# Allegro board mib_fp_jtag_serial_12.brd
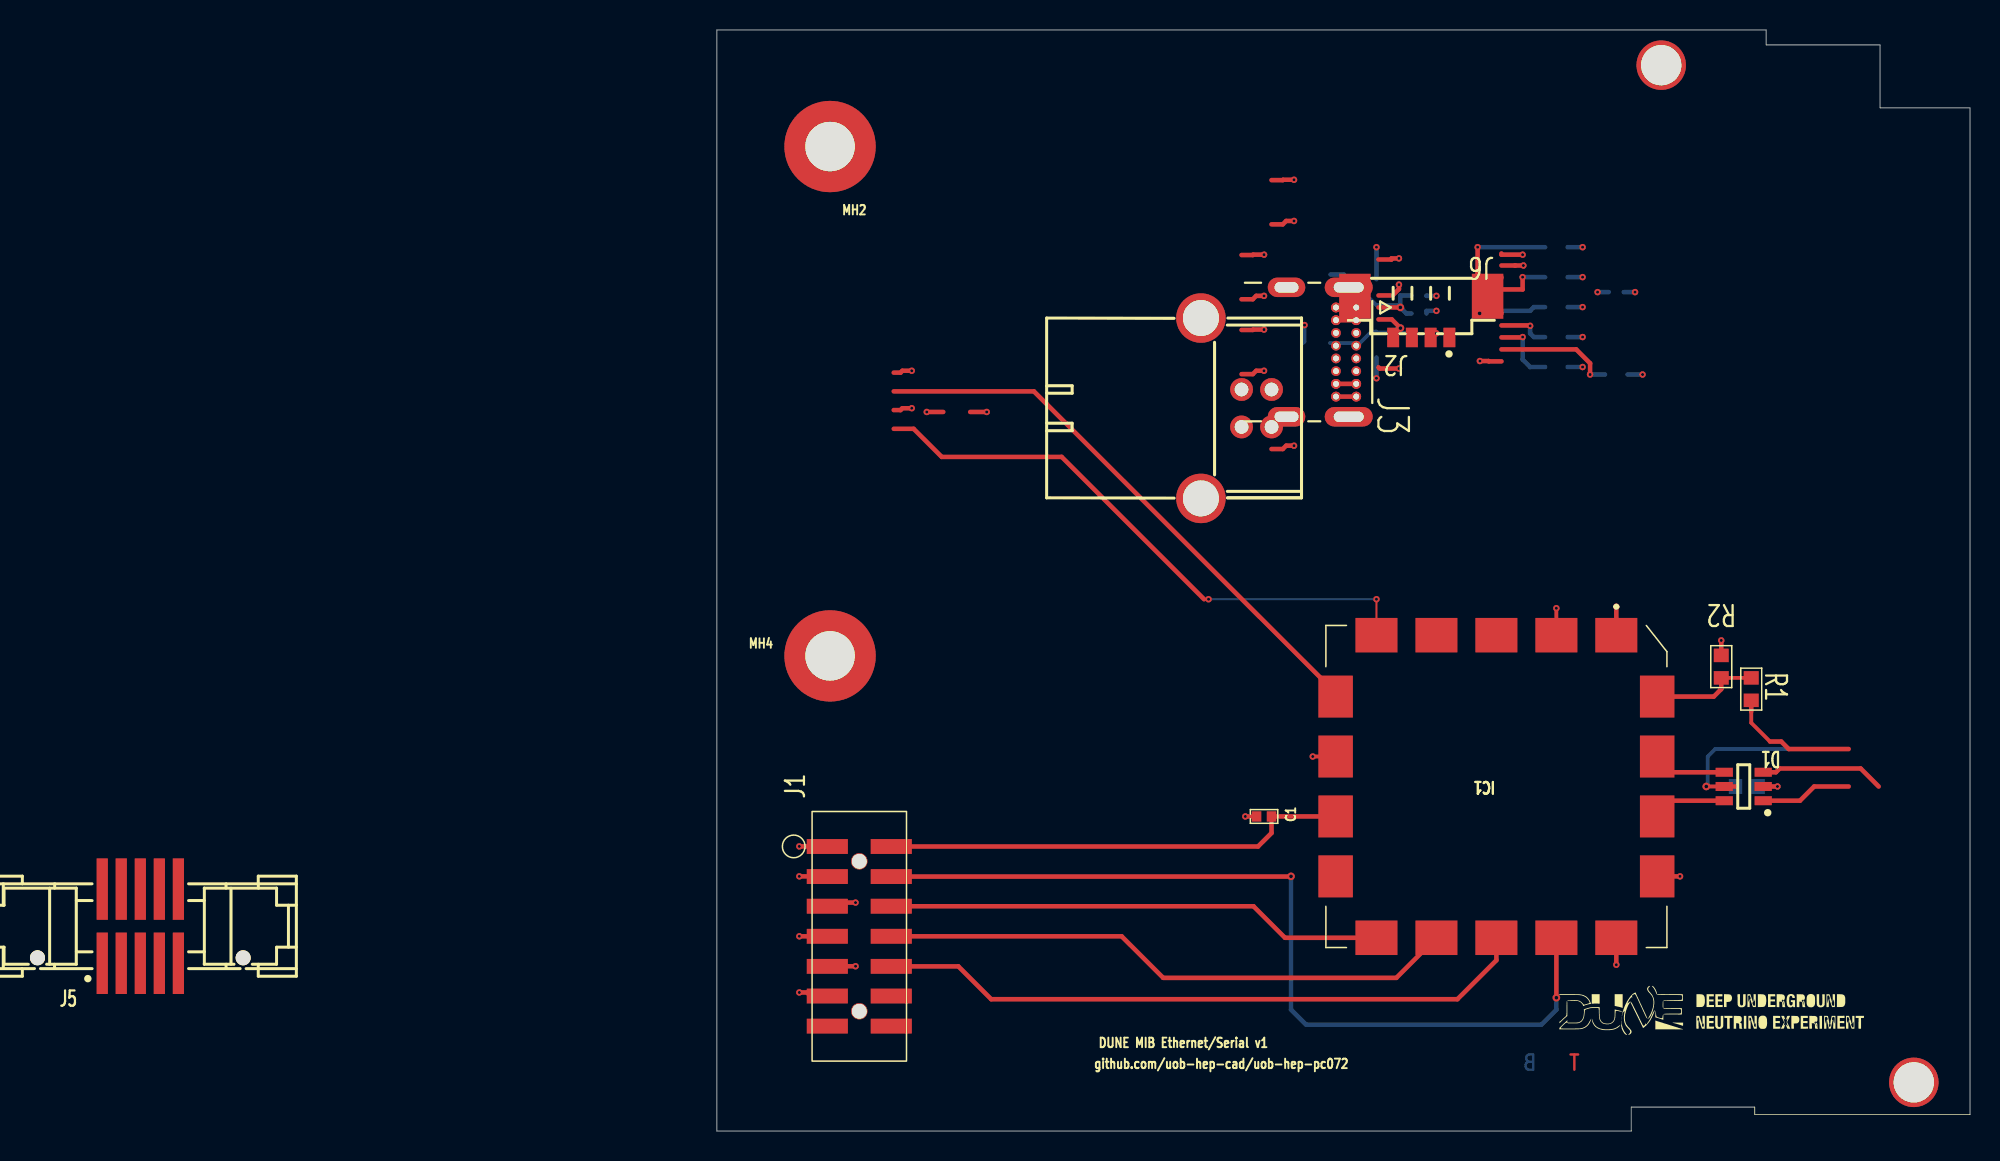
[diagram p0: board, top side]
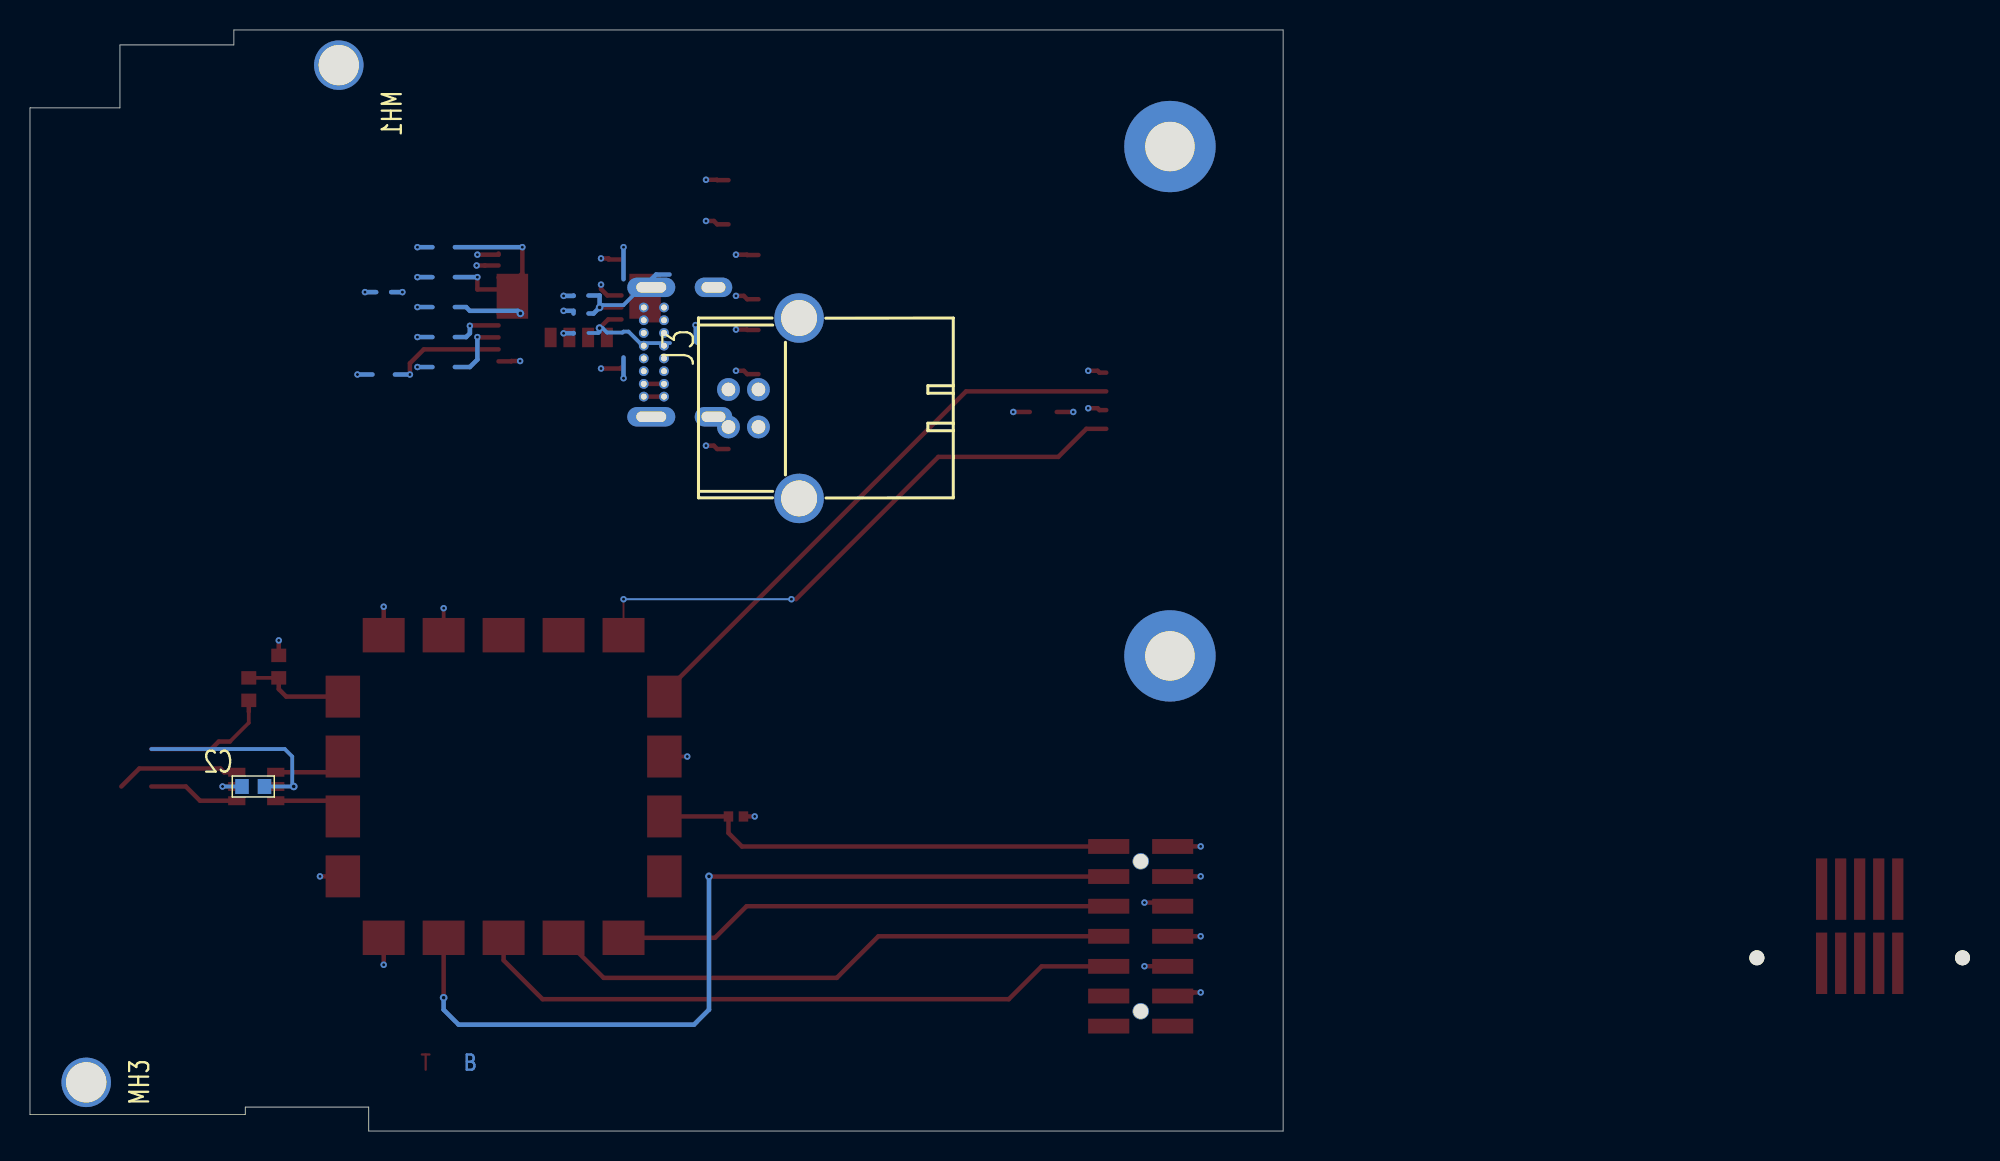
[diagram p1: board, bottom side, seen from below]

Outline 83.59 x 73.5 mm; copper layers: TOP, 02_GND, 03_VCC, BOTTOM. Coordinates in mm from the lower left corner of the outline.
Outline path: 0,73.5 70,73.5 70,72.5 77.59,72.5 77.59,68.3 83.59,68.3 83.59,1.1 69.24,1.1 69.24,1.6 61,1.6 61,0 0,0 0,73.5

## Design rules (mm)
constraint set DEFAULT: min track width 0.127
net group VREF_JTAG: nets GND VREF_JTAG

## Placement (name value [footprint] x y rotation side)
C1  0.1UF  [CAP0402]  36.5 21 180 top
C2  100nF  [C0603]  68.7 23 180 bottom
D1  -  [SOT95P280X145-6N]  68.5 23 180 top
IC1  -  [410357B]  52 23 180 top
J1  7X2RECPT_SMD_2MM  [HDR14PINSMD]  9.5 13 90 top
J2  -  [MOLEX_2137160001]  35 52 270 top
J3  -  [JACK12X17_USB4B]  37 47 270 top
J5  -  [SAMTEC_EHF-105-01-L-D-SM-LC]  -38.46 13.67 0 top
J6  -  [MOLEX_53398-0471]  48.24 54.77 180 top
MH1  MT_HOLE  [MOUNTHOLE]  63 71.15 180 bottom
MH2  MT_HOLE  [MOUNTHOLE]  7.55 65.72 0 top
MH3  MT_HOLE  [MOUNTHOLE]  79.84 3.25 180 bottom
MH4  MT_HOLE  [MOUNTHOLE]  7.55 31.72 0 top
NOREF  -  []  0 0 90 top
NOREF#2  -  []  56.2 6.4 0 top
NOREF#3  -  []  0 73.5 0 top
R1  4.7k  [C0603]  69 29.5 270 top
R2  10k  [C0603]  67 31 270 top

## Library data of the parts
C1 = CAP_NP: Tolerance: TOL?; User Part Number: 445-7348-2-ND; part number: CAP_NP-445-7348-2-ND,CAP_NP; room: JTAG
C2 = CAPCERSMDCL2: part number: CAPCERSMDCL2_0603-100NF,16V; tolerance: 10%
D1 = USBLC6-2: part number: USBLC6-2SC6
IC1 = 410_357_B: part number: 410_357_B-DIGILENT,410-357-B
J1 = 7X2RECPT_SMD_2MM: User Part Number: 878321420; part number: 7X2RECPT_SMD_2MM-878321420,7X2RECPT_SMD_2MM; room: JTAG
J2 = CON16P_USB_C_USB2: part number: CON16P_USB_C_USB2-2137160001
J3 = CON4P: part number: CON4P-67068-8001
J5 = CON10P: part number: CON10P-EHF-105-01-L-D-SM-LC
J6 = CON4P: part number: CON4P-53398-0471
MH1 MH2 = MT_HOLE: part number: MT_HOLE-MT_HOLE,MT_HOLE; room: TE0712
MH3 MH4 = MT_HOLE: part number: MT_HOLE-MT_HOLE,MT_HOLE
R1 = RSMD0603: part number: RSMD0603_1/10W-4.7K,1%; tolerance: 1%
R2 = RSMD0603: part number: RSMD0603_1/10W-10K,1%; tolerance: 1%

## Footprints (pads in the part's own frame, mm; a bottom-side part is the same pattern mirrored in y, then rotated)
410357B
  rect 2.8x2.3 smd: 1(-8,-10.1) 2(-4,-10.1) 3(0,-10.1) 4(4,-10.1) 5(8,-10.1) 10(8,10.1) 11(4,10.1) 12(0,10.1) 13(-4,10.1) 14(-8,10.1)
  rect 2.3x2.8 smd: 6(10.725,-6) 7(10.725,-2) 8(10.725,2) 9(10.725,6) 15(-10.725,6) 16(-10.725,2) 17(-10.725,-2) 18(-10.725,-6)
C0603
  rect 0.9x1 smd: 1(-0.75,0) 2(0.75,0)
CAP0402
  rect 0.635x0.686 smd: 1(-0.499,0) 2(0.499,0)
HDR14PINSMD
  round 1.092 hole 0.991 unplated: (-5.004,0) (5.004,0)
  rect 0.991x2.743 smd: 1(5.994,2.134) 2(5.994,-2.134) 3(3.988,2.134) 4(3.988,-2.134) 5(2.007,2.134) 6(2.007,-2.134) 7(0,2.134) 8(0,-2.134) 9(-2.007,2.134) 10(-2.007,-2.134) 11(-3.988,2.134) 12(-3.988,-2.134) 13(-5.994,2.134) 14(-5.994,-2.134)
JACK12X17_USB4B
  round 1.524 hole 0.914: 1(0,0) 2(-2.5,0) 3(-2.5,-2) 4(0,-2)
  round 3.302 hole 2.4: 5(-7.27,-4.71) 6(4.77,-4.71)
MOLEX_53398-0471
  rect 2.1x3 smd: (-3.175,-0.95) (5.675,-0.95)
  rect 0.8x1.3 smd: 1(-0.625,1.8) 2(0.625,1.8) 3(1.875,1.8) 4(3.125,1.8)
MOLEX_2137160001
  round 0.648 hole 0.4: A1(-2.975,7.65) A4(-2.125,7.65) A5(-1.275,7.65) A6(-0.425,7.65) A7(0.425,7.65) A8(1.275,7.65) A9(2.125,7.65) A12(2.975,7.65) B1(2.975,6.3) B4(2.125,6.3) B5(1.275,6.3) B6(0.425,6.3) B7(-0.425,6.3) B8(-1.275,6.3) B9(-2.125,6.3) B12(-2.975,6.3)
  oval 1.3x2.5 hole 0.7x1.6: SH1(-4.32,3) SH2(4.32,3)
  oval 1.3x3.2 hole 0.7x2: SH3(-4.32,7.15) SH4(4.32,7.15)
MOUNTHOLE
  round 6.096 hole 3.302: 1(0,0)
SAMTEC_EHF-105-01-L-D-SM-LC
  round 1 hole 1.2 unplated: (-6.86,-2.11) (6.86,-2.11)
  rect 0.75x4.1 smd: 1(-2.54,-2.475) 2(-2.54,2.475) 3(-1.27,-2.475) 4(-1.27,2.475) 5(0,-2.475) 6(0,2.475) 7(1.27,-2.475) 8(1.27,2.475) 9(2.54,-2.475) 10(2.54,2.475)
SOT95P280X145-6N
  rect 1.15x0.6 smd: 1(-1.3,0.95) 2(-1.3,0) 3(-1.3,-0.95) 4(1.3,-0.95) 5(1.3,0) 6(1.3,0.95)

## Nets
GND: C1.2 C2.1 D1.2 IC1.1 IC1.7 IC1.14 J1.1 J1.3 J1.5 J1.7 J1.9 J1.11 J3.4(A<3>) J3.5 J3.6 J5.2 J5.10(A<9>) J6.1 MH1.1(MH_SIG) MH2.1(MH_SIG) MH3.1(MH_SIG) MH4.1(MH_SIG) R2.1
P5V: C2.2(B<0>) D1.5(VBUS) J3.1 R1.2(B<0>)
VCC3V3: IC1.2 IC1.15 J6.3
MP3V3: J5.4
RESET*: J5.6
TCK: IC1.10 J1.6 J5.1
TDI: IC1.12 J1.10 J5.9
TDO: IC1.11 J1.8 J5.3
TMS: IC1.13 J1.4 J5.5
TRST*: J5.8
UART_RX_TO_FPGA_3V3: IC1.6 J6.2
UART_TX_FROM_FPGA_3V3: IC1.5 J6.4(A<3>)
UNNAMED_1_410357B_I128_USBDM: D1.6 IC1.16
UNNAMED_1_410357B_I128_USBDP: D1.4 IC1.17
UNNAMED_1_410357B_I128_VBUSDETE: IC1.18 R1.1 R2.2(B<0>)
UNNAMED_1_CON4P_I129_A: D1.1 J3.2
UNNAMED_1_CON4P_I129_A_1: D1.3 J3.3
VREF_JTAG: C1.1 IC1.8(VREF_JTAG) J1.2

Pads without a net: IC1 3 4 9; J1 12 13 14; J2 A1 A4 A5 A6 A7 A8 A9 A12 B1 B4 B5 B6 B7 B8 B9 B12 SH1 SH2 SH3 SH4; J5 7

## Via types
v1: diameter 0.508, hole 0.254, TOP to BOTTOM, 6 vias
v2: diameter 0.432, hole 0.203, TOP to BOTTOM, 52 vias

## Routing (per net, layer and track width the routed paths; a pad name or vN(x,y) marks a point on that pad's centre or on a via; arc(x,y) is an arc through that point)
GND: length 50.5
  TOP w0.254: v2(39.75,25) IC1.7
  TOP w0.3: 52.34,57.78 53.25,57.78 53.25,57.78 v2(53.8,57.78) ; v2(13,50.75) 12.38,50.75 12.25,50.62 11.8,50.62 ; v2(60,11.1) IC1.14 ; 52.34,58.58 52.34,58.5 v2(53.75,58.5) ; v2(35.25,21) C1.2 ; v2(45.5,50.9) 44.22,50.9 44.14,50.98 ; v2(5.5,13) J1.7 ; v2(38.5,63.5) 37.78,63.5 37.75,63.48 37,63.48 ; v2(50.9,51.4) 51.48,51.4 51.5,51.38 52.34,51.38 ; v2(36.5,53.5) 35.78,53.5 35.75,53.48 35,53.48 ; v2(45.5,58.25) 45,58.25 45,58.18 44.14,58.18 ; J1.5 8.25,15.01 8.49,15.25 v2(9.25,15.25) ; v2(38.5,45.75) 37.97,45.75 37.75,45.52 37,45.52 ; v2(70.75,23) D1.2 ; v2(18,48) 16.9,48 ; v2(5.5,19) 6.24,19 6.25,18.99 J1.1 ; v2(36.5,55.75) 35.97,55.75 35.75,55.52 35,55.52 ; 35,58.48 35.75,58.48 35.78,58.5 v2(36.5,58.5) ; J1.9 8.25,10.99 8.26,11 v2(9.25,11) ; v2(45.5,56.5) 45.5,56.2 45.08,55.78 44.14,55.78 ; v2(67,32.75) R2.1 ; 37,60.52 37.75,60.52 37.97,60.75 v2(38.5,60.75) ; J1.11 6.25,9.01 6.01,9.25 v2(5.5,9.25) ; v2(36.5,50.75) 35.97,50.75 35.75,50.52 35,50.52 ; J1.3 6.25,16.99 6.24,17 v2(5.5,17) ; v2(60,35) IC1.1
  BOTTOM w0.25: C2.1 v2(70.75,23)
  BOTTOM w0.3: v2(48,54.75) 47.34,54.75 47.34,54.57 ; v2(44,50.25) 44,51.63 ; v2(57.75,51) 56.75,51 ; v2(61.25,56) 60.5,56 ; 47.34,55.77 47.34,55.75 v2(48,55.75) ; v2(48,53.25) 47.34,53.25 47.34,53.27 ; v2(44,59) 44,56.87
P5V: length 24.3
  TOP w0.25: D1.5 v1(66,23) ; 70.25,26 69,27.25 69,28
  TOP w0.3: 68,23 D1.5 ; 70.25,26 71,26 71.5,25.5 75.5,25.5 ; 69,28 R1.2
  BOTTOM w0.25: 75.5,25.5 66.6,25.5 66.1,25 66.1,23.1 v1(66,23) C2.2
VCC3V3: length 63.9
  TOP w0.25: 45.5,53.7 v1(45.6,53.6)
  TOP w0.254: v2(56,34.9) IC1.2
  TOP w0.3: 52.34,56.98 51.02,56.98 50.75,57.25 v2(50.75,59) ; v2(54.25,53.75) 54.22,53.78 52.34,53.78 ; 44.14,54.18 45.02,54.18 45.5,53.7 ; 52.34,56.18 53.75,56.18 v2(53.75,57) ; 52.34,54.58 v1(50.88,54.58) ; v2(53.75,53) 53.73,52.98 52.34,52.98 ; 11.8,48.12 12.25,48.12 12.38,48.25 v2(13,48.25) ; 44.14,54.98 v1(45.59,54.98) ; 52.34,52.18 57.32,52.18 58.25,51.25 v2(58.25,50.5) ; v2(64.25,17) IC1.15 ; v2(14,48) 15.1,48
  BOTTOM w0.25: 43,56 43.13,56 44,55.13 45.44,55.13 v1(45.59,54.98) ; v2(39.2,53.8) 39.2,52.7 39.1,52.6 ; 40.9,52.6 42.9,52.6 43.66,53.37 44,53.37 44.06,53.3 45.1,53.3 45.4,53.6 v1(45.6,53.6) 45.6,53.35 45.68,53.27 46.34,53.27
  BOTTOM w0.3: 40.94,57.17 41.83,57.17 43,56 ; 46.34,54.57 46,54.57 v1(45.59,54.98) 45.59,55.77 46.34,55.77 ; v2(58.75,56) 59.5,56 ; v1(50.88,54.58) 51.05,54.75 54.25,54.75 54.5,55 55.25,55 ; v2(57.75,59) 56.75,59 ; 55.25,51 54.25,51 53.75,51.5 v2(53.75,53) ; 55.25,53 54.5,53 54.25,53.25 v2(54.25,53.75) ; 55.25,57 v2(53.75,57) ; v2(57.75,57) 56.75,57 ; v2(57.75,53) 56.75,53 ; 55.25,59 v2(50.75,59) ; v2(57.75,55) 56.75,55 ; 59.25,50.5 v2(58.25,50.5) ; v2(61.75,50.5) 60.75,50.5
TCK: length 33.2
  TOP w0.3: J1.6 35.79,15.01 37.9,12.9 IC1.10
TDI: length 43.9
  TOP w0.3: J1.10 16.11,10.99 18.3,8.8 49.4,8.8 52,11.4 IC1.12
TDO: length 38.6
  TOP w0.3: J1.8 27,13 29.78,10.22 45.32,10.22 IC1.11
TMS: length 58.9
  TOP w0.3: J1.4 38.29,16.99 v1(38.3,17) ; v1(56,8.9) IC1.13
  BOTTOM w0.3: v1(38.3,17) 38.3,8.1 39.3,7.1 55,7.1 56,8.1 v1(56,8.9)
UART_RX_TO_FPGA_3V3: length 38.1
  TOP w0.127: 41.28,29.25 IC1.6
  TOP w0.3: 11.8,49.38 21.15,49.38 41.28,29.25
UART_TX_FROM_FPGA_3V3: length 39.3
  TOP w0.127: 32.5,35.5 v2(32.8,35.5) ; IC1.5 v2(44,35.5)
  TOP w0.3: 11.8,46.88 13.12,46.88 15,45 23,45 32.5,35.5
  BOTTOM w0.127: v2(32.8,35.5) v2(44,35.5)
UNNAMED_1_410357B_I128_USBDM: length 5.1
  TOP w0.3: IC1.16 62.72,21.25 63.53,22.05 D1.6
UNNAMED_1_410357B_I128_USBDP: length 4.9
  TOP w0.3: IC1.17 63.78,23.95 D1.4
UNNAMED_1_410357B_I128_VBUSDETE: length 7.2
  TOP w0.25: R1.1 R2.2
  TOP w0.3: IC1.18 66.5,29 67,29.5 R2.2
UNNAMED_1_CON4P_I129_A: length 6.1
  TOP w0.3: 75.5,23 73.2,23 72.25,22.05 D1.1
UNNAMED_1_CON4P_I129_A_1: length 8.3
  TOP w0.3: 77.5,23 76.3,24.2 70.9,24.2 70.65,23.95 D1.3
VREF_JTAG: length 31.1
  TOP w0.3: IC1.8 C1.1 37,19.89 36.1,18.99 J1.2

## Copper pours and planes (outline as drawn; the poured copper is in the pictures)
GND on 02_GND: 60.36,0.64 0.5,0.64 0.5,72.86 69.36,72.86 69.36,71.86 76.96,71.86 76.96,67.67 82.96,67.67 82.96,1.74 69.87,1.74 69.87,2.23 60.36,2.23 ; 1 cut-out
VCC3V3 on 03_VCC: 60.36,0.64 0.5,0.64 0.5,72.86 69.36,72.86 69.36,71.86 76.96,71.86 76.96,67.67 82.96,67.67 82.96,1.74 69.87,1.74 69.87,2.23 60.36,2.23 ; 1 cut-out

Small or netless copper shapes (teardrops, artwork), in the pictures only: 4 on TOP

## Text on the board
BOTTOM: B
TOP: T
Ref Des/Silkscreen Top: github.com/uob-hep-cad/uob-hep-pc072 | DUNE MIB Ethernet/Serial v1
02_GND: 2
03_VCC: 3
User.45: FIGURE | FINISHED_SIZE | 0.2032 | 0.254 | 0.85 | 0.9144 | 0.95 | 1.05 | 2.4 | 2.692 | 3.302 | 0.9906 | 1.55 | DRILL CHART: TOP to BOTTOM | ALL UNITS ARE IN MILLIMETERS | TOLERANCE_DRILL | +0.0/-0.2029 | +0.0/-0.254 | +0.0/-0.0 | PLATED | NON-PLATED | QTY | 55 | 7 | 1 | 4 | 9 | 10 | 2 | MICRO-TCA INTERFACE BOARD (MIB) front panel ethernet DB | 1. BOARD THICKNESS: 1.57mm | 2. MATERIAL: FR4 (RoHS COMPLIANT MATERIAL) OR EQUIVALENT. GLASS | 3. ALL HOLES ARE PLATED THROUGH UNLESS OTHERWISE NOTED | 5. ALL TOLERANCES +/-3MILS EXCEPT WHERE NOTED
